# Altium PCB 0060631C.PcbDoc (part 2 of 7)
Units mil, origin at the board's own origin, x right, y up, seen from the top; angles counter-clockwise.
Board outline 5480 x 8249 mil, 6 copper layers (Top Layer, Mid-Layer 1, Mid-Layer 2, Internal Plane 1, Internal Plane 2, Bottom Layer); 514 components, 269 nets, 1375 pads, 1334 vias.
Unrouted connection lines stored in the file: 126.
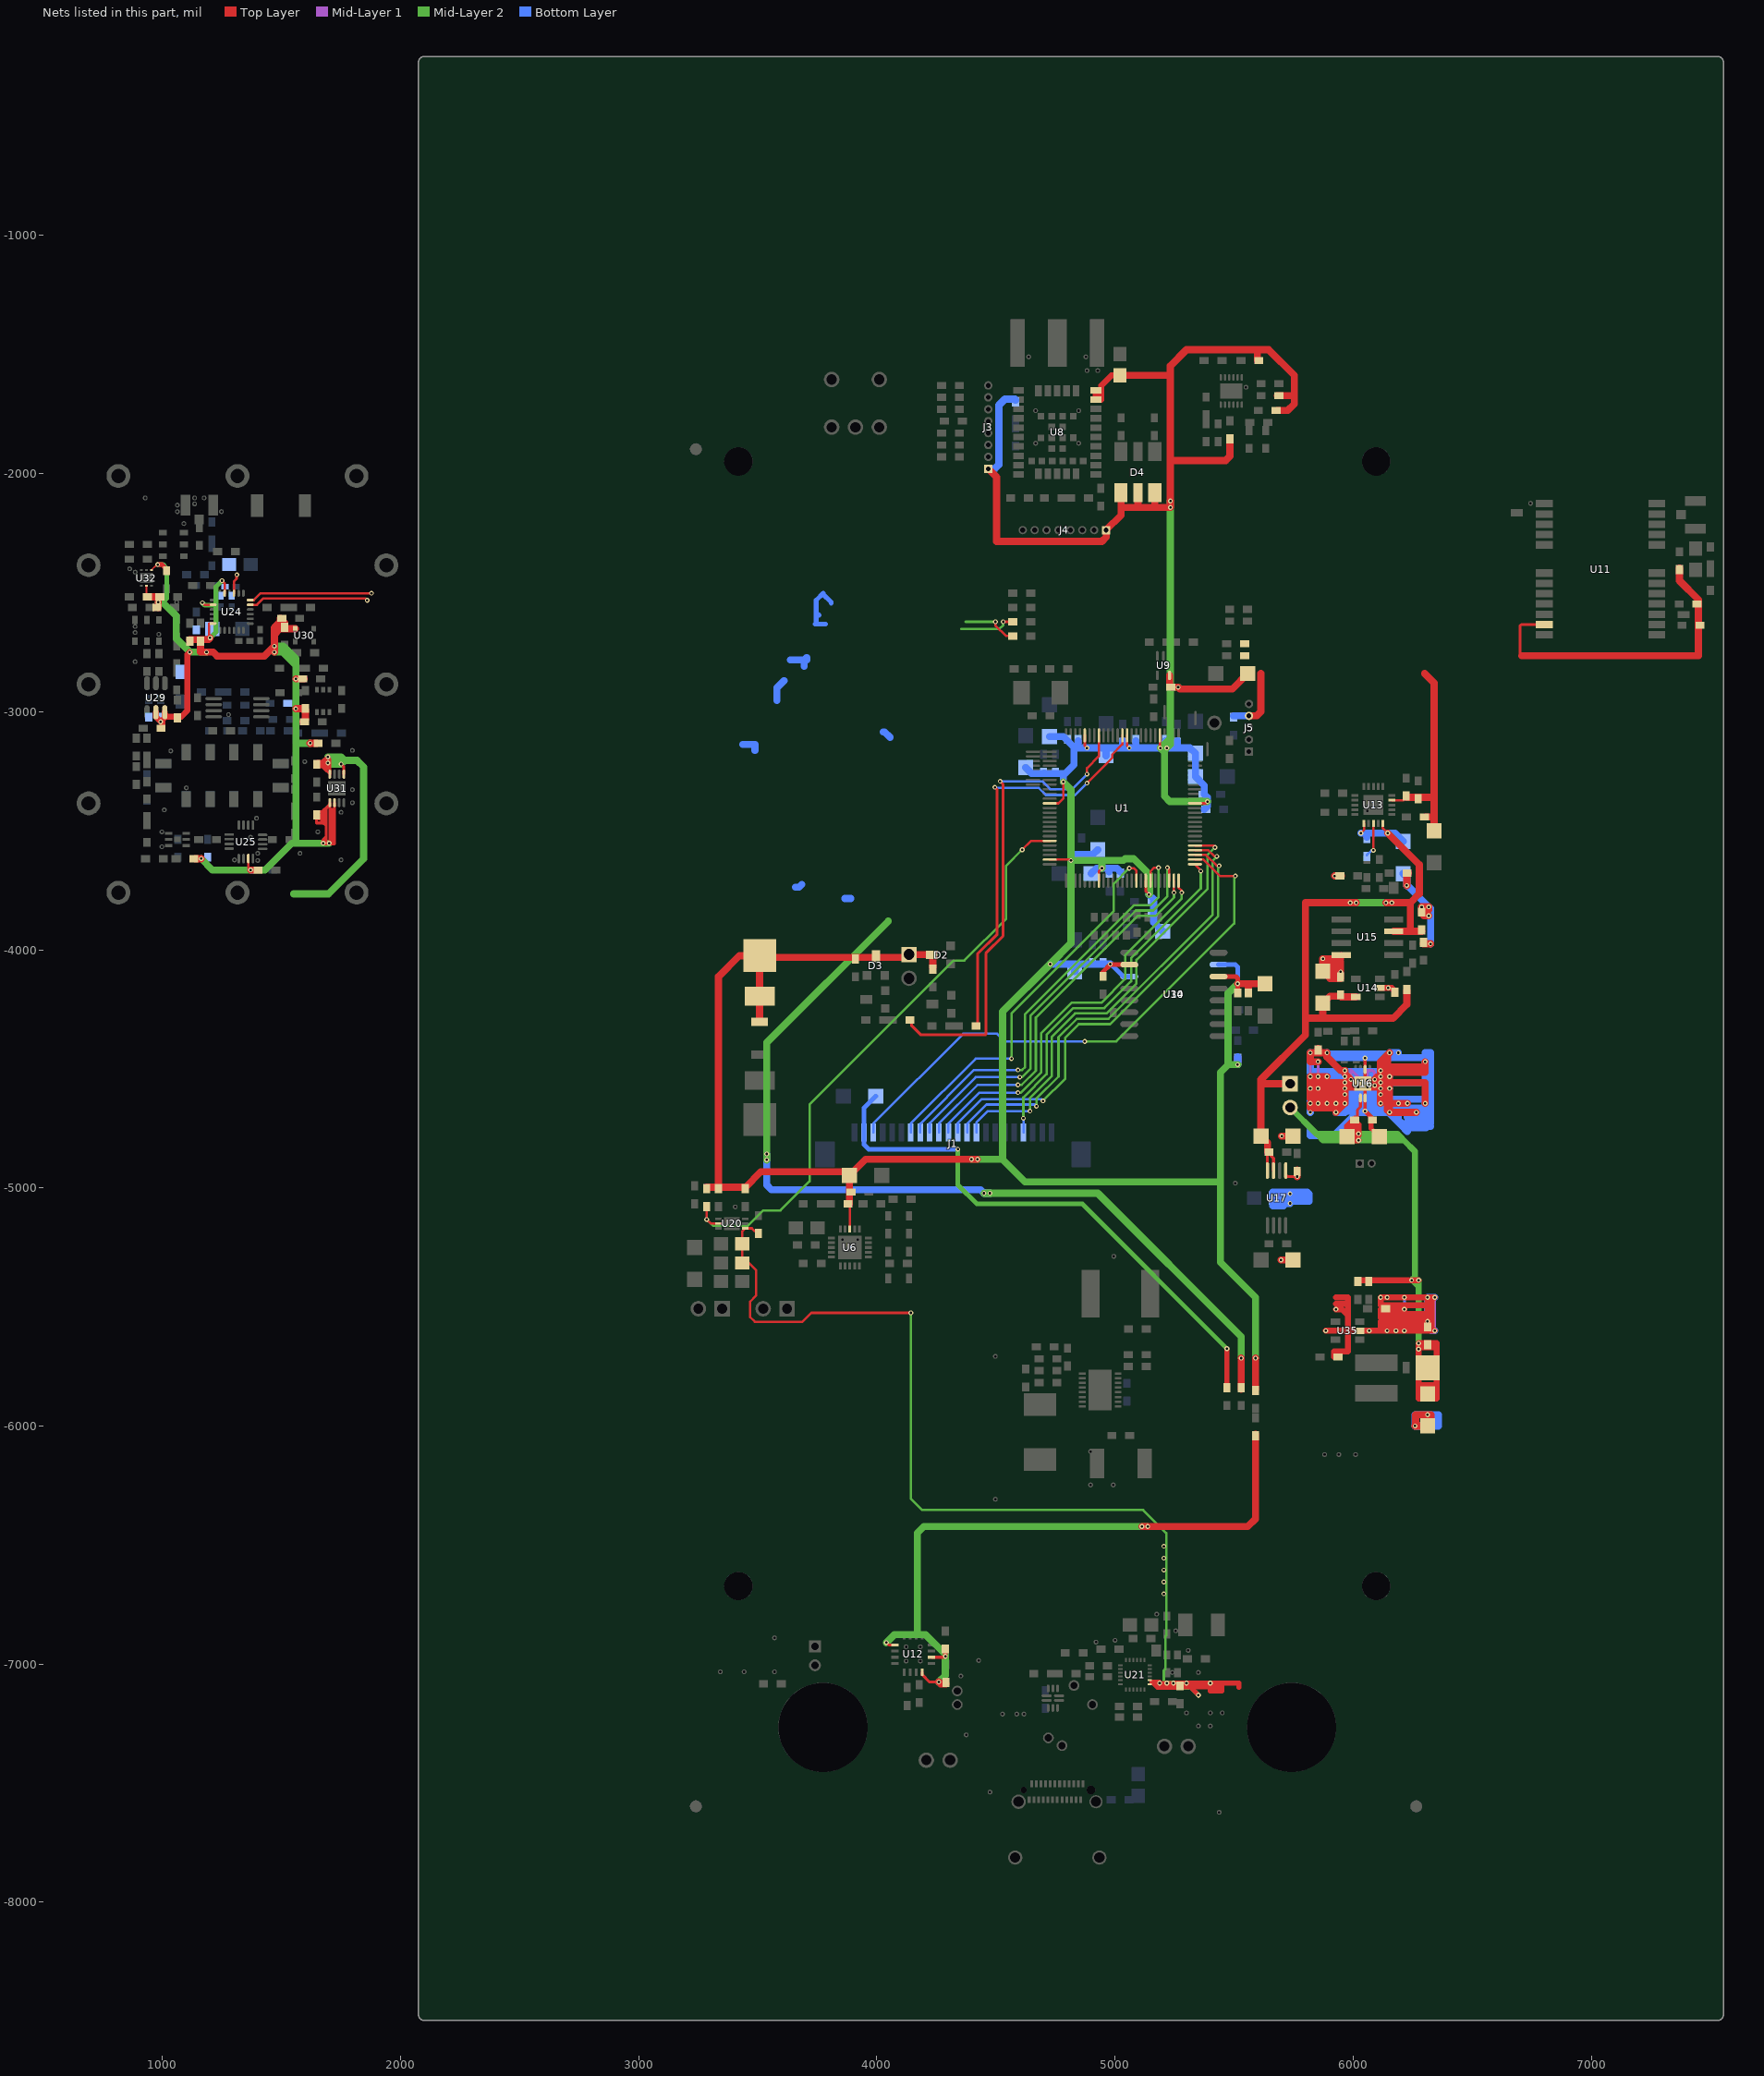
[diagram p6: the nets of this part, all layers, seen from the top]

## Via types
v1: diameter 20, hole 10, Top Layer to Bottom Layer, 1334 vias

## Nets (pads, with @x,y where several pads share a name; then routed paths per layer and width w, separated by ;. In a path a pad name is that pad's centre, name@x,y a point inside that pad or via, vN(x,y) a via of type N, cw(c..) or ccw(c..) an arc to the next point about the centre after c; other vN are vias at no path point)
+3.3V: BZ1.1 BZ2.1 BZ3.1 BZ4.1 C1.1 C2.1 C3.1 C4.1 C5.1 C6.1 C7.1 C8.1 C9.1 C10.1 C13.1 C14.1 C15.1 C16.1 C17.1 C18.1 C19.1 C20.1 C21.1 C22.1 C23.1 C24.1 C25.1 C26.1 C27.1 C30.1 C32.1 C33.1 C34.1 C35.1 C36.1 C37.1 C38.1 C41.1 C47.1 C57.1 C122.1 C123.1 C124.1 D2.3 D3.3 D4.2 D4.4 D4.6 J3.1 J4.1 J5.4 R3.1 R8.1 R22.1 R25.1 R30.1 R31.1 R32.2 R40.2 R42.2 R43.1 R44.2 R67.1 R74.2 R75.1 R80.2 R81.1 R83.1 R84.1 R85.1 R124.2 U1.14 U1.30 U1.37 U1.46 U1.62 U1.74 U1.83 U1.93 U6.18 U8.9 U8.10 U9.5 U10.2 U10.14 U11.23 U13.14 U34.2 U34.14 | length 21028.3
  Top Layer w10: R25.1@3885,-5067.5 3886.4,-5068.9 U6.18@3886.4,-5173 ; U1.74@4725.6,-3621.3 4811.3,-3621.3 v1(4815,-3625) ; U1.62@4725.6,-3384.9 4762.6,-3384.9 4782.5,-3365 v1(4782.5,-3295) ; U1.46@4873,-3099.6 4873,-3143 v1(4882.5,-3152.5) ; U1.83@4932.1,-3709.6 4932.1,-3670.4 v1(4945,-3657.5) ; U1.37@5050.3,-3099.6 5050.3,-3142.8 v1(5060,-3152.5) ; U1.93@5129.1,-3709.6 5129.1,-3754.1 v1(5142.5,-3767.5) ; U1.30@5188.2,-3099.6 v1@5188.2,-3150.7 ; U1.14@5335.6,-3384.9 5380.1,-3384.9 v1(5387.5,-3377.5) ; U13.14@6162.3,-3372.2 6210.3,-3372.2 C41.1@6222.5,-3360 ; v1@5188.2,-3150.7 v1(5190,-3152.5) v1@5188.2,-3150.7
  Top Layer w12: 6707.5,-2765 6700,-2757.5 6700,-2690 6700,-2640 6705.8,-2634.2 U11.23@6802.8,-2634.2
  Top Layer w20: R40.2@4950,-4117.5 4950,-4092.5 v1@4980,-4062.5 ; v1(4980,-4060) v1@4980,-4062.5 ; U10.2@5060,-4062.5 v1@4980,-4062.5 ; U10.14@5435,-4112.5 5507.5,-4112.5 5515,-4120 v1(5515,-4142.5) ; v1(5515,-4142.5) 5515,-4175 v1(5515,-4142.5)
  Top Layer w26: C25.1@5020,-1587.5 4985,-1587.5 4942.3,-1630.2 4942.3,-1649.8 ; 4942.3,-1649.8 4942.3,-1689.2 U8.9@4919.5,-1689.2 U8.10@4919.5,-1649.8 4942.3,-1649.8
  Top Layer w30: R83.1@3285,-4997.5 R84.1@3335,-4997.5 ; BZ2.1@3507.5,-4302.5 BZ1.1@3507.5,-4195 BZ4.1@3507.5,-4025 ; R25.1@3885,-5067.5 3885,-5017.5 C32.1@3885,-4947.5 ; R8.1@4235,-4075 4235,-4020 BZ3.1@4135,-4020 4122.5,-4032.5 3997.5,-4032.5 3910,-4032.5 3515,-4032.5 BZ4.1@3507.5,-4025 ; v1(4422.5,-4880) v1(4397.5,-4880) 3952.5,-4880 C32.1@3885,-4947.5 ; J3.1@4467.5,-1980 4502.5,-2015 4502.5,-2285 4945,-2285 4963.8,-2266.2 J4.1@4963.8,-2236.2 ; J4.1@4962.5,-2237.5 J4.1@4963.8,-2236.2 ; C25.1@5020,-1587.5 5232.5,-1587.5 ; D4.2@5025,-2080.5 5025,-2142.5 ; D4.4@5096,-2080.5 5096,-2141.5 ; U9.5@5228.7,-2847.5 5228.7,-2886.2 5240,-2897.5 v1(5265,-2897.5) 5272.5,-2905 5492.5,-2905 C37.1@5557.5,-2840 ; R81.1@5482.5,-1860 5482.5,-1927.5 5465,-1945 5232.5,-1945 ; v1(5515,-4142.5) 5560,-4142.5 ; C34.1@5560,-4175 5560,-4142.5 ; J5.4@5562.5,-3017.5 5595,-3017.5 5612.5,-3000 5612.5,-2840 ; R67.1@5590,-5845 v1(5590,-5715) ; R74.2@5597.5,-1525 5597.5,-1480 ; C35.1@5630,-4142.5 5560,-4142.5 ; R75.1@5682.5,-1735 5725,-1735 5752.5,-1707.5 5752.5,-1672.5 ; R80.2@5682.5,-1672.5 5752.5,-1672.5 ; C41.1@6222.5,-3360 6272.5,-3360 6340,-3360 ; 6300,-2840 6340,-2880 6340,-3360 ; R31.1@6305,-3442.5 6340,-3442.5 ; C57.1@6340,-3500 6340,-3442.5 ; 6707.5,-2765 6762.5,-2765 7450,-2765 7450,-2637.5 7450,-2547.5 7450,-2530 7370,-2450 R42.2@7370,-2397.5 ; R84.1@3335,-4997.5 3447.5,-4997.5 3512.5,-4932.5 3870,-4932.5 C32.1@3885,-4947.5 ; R84.1@3335,-4997.5 3335,-4112.5 3422.5,-4025 BZ4.1@3507.5,-4025 ; J4.1@4963.8,-2236.2 5025,-2175 5025,-2142.5 ; 5025,-2142.5 5095,-2142.5 ; 5095,-2142.5 5096,-2141.5 ; 5095,-2142.5 5096,-2142.5 ; 5096,-2142.5 5167,-2142.5 D4.6@5167,-2080.5 5167,-2142 5167.5,-2142.5 ; 5096,-2142.5 5167.5,-2142.5 ; 5096,-2142.5 5096,-2141.5 ; 5167.5,-2142.5 v1(5232.5,-2142.5) v1(5232.5,-2115) 5232.5,-1945 ; 5232.5,-1945 5232.5,-1587.5 ; 5232.5,-1587.5 5232.5,-1547.5 5300,-1480 5597.5,-1480 ; 5597.5,-1480 5645,-1480 5752.5,-1587.5 5752.5,-1672.5 ; 6340,-3442.5 6340,-3360
  Mid-Layer 2 w30: v1(4397.5,-4880) v1(4422.5,-4880) 4527.5,-4880 ; v1(4782.5,-3295) 4815,-3327.5 v1(4815,-3625) ; v1(4945,-3657.5) 4945,-3625 ; v1(5142.5,-3767.5) 5145,-3765 5145,-3685 5077.5,-3617.5 5042.5,-3617.5 5035,-3625 4945,-3625 ; v1(5232.5,-2115) v1(5232.5,-2142.5) 5232.5,-2897.5 ; v1(5265,-2897.5) 5232.5,-2897.5 ; v1(5387.5,-3377.5) 5230,-3377.5 5207.5,-3355 5207.5,-3170 ; v1(5515,-4482.5) 5475,-4482.5 ; v1(5515,-4142.5) 5475,-4182.5 5475,-4482.5 ; v1(5590,-5715) 5590,-5460 5442.5,-5312.5 5442.5,-4975 ; 4527.5,-4880 4622.5,-4975 5442.5,-4975 ; 4527.5,-4880 4527.5,-4260 v1(4727.5,-4060) 4815,-3972.5 v1(4815,-3625) ; v1(4815,-3625) 4945,-3625 ; v1(5190,-3152.5) v1(5217.5,-3152.5) ; v1(5190,-3152.5) 5207.5,-3170 ; v1(5190,-3152.5) 5207.5,-3170 ; v1(5190,-3152.5) 5232.5,-3110 ; 5207.5,-3170 5207.5,-3162.5 v1(5217.5,-3152.5) ; v1(5217.5,-3152.5) 5232.5,-3137.5 5232.5,-3110 ; 5232.5,-3110 5232.5,-2897.5 ; 5442.5,-4975 5442.5,-4515 5475,-4482.5
  Bottom Layer w20: v1(4980,-4060) 4982.5,-4060 5035,-4112.5 U34.14@5060,-4112.5 ; U34.2@5435,-4062.5 5505,-4062.5 5515,-4072.5 v1(5515,-4142.5)
  Bottom Layer w30: J3.1@4467.5,-1980 4495,-1980 4512.5,-1962.5 4512.5,-1712.5 4537.5,-1687.5 4580,-1687.5 4582.5,-1690 R30.1@4582.5,-1692.5 ; C20.1@4625,-3235 4650,-3260 C26.1@4700,-3260 ; C18.1@4725,-3105 4782.5,-3105 4800,-3122.5 4827.5,-3150 4827.5,-3152.5 ; v1(4727.5,-4060) 4832.5,-4060 ; v1(4782.5,-3295) 4782.5,-3260 ; C124.1@4830,-4092.5 4832.5,-4090 4832.5,-4060 ; C27.1@4845,-3122.5 4845,-3152.5 ; C19.1@4900,-3680 4922.5,-3657.5 v1(4945,-3657.5) 4975,-3657.5 ; C24.1@4927.5,-3580 4907.5,-3600 4860,-3600 C1.1@4815,-3600 ; C22.1@4962.5,-3185 4962.5,-3152.5 ; C5.1@4975,-3672.5 4975,-3657.5 ; v1(4980,-4060) 4950,-4060 4905,-4060 4832.5,-4060 ; C6.1@5022.5,-3672.5 5007.5,-3657.5 4975,-3657.5 ; C13.1@5032.5,-3122.5 5032.5,-3152.5 ; C14.1@5087.5,-3122.5 5087.5,-3152.5 ; v1(5142.5,-3767.5) 5162.5,-3787.5 5162.5,-3797.5 5162.5,-3847.5 5162.5,-3885 C23.1@5200,-3922.5 ; C9.1@5212.5,-3122.5 v1@5212.5,-3152.5 ; C8.1@5262.5,-3122.5 5262.5,-3152.5 ; C16.1@5375,-3410 5387.5,-3397.5 v1(5387.5,-3377.5) 5387.5,-3360 5375,-3347.5 5375,-3310 C21.1@5337.5,-3272.5 C17.1@5337.5,-3175 5315,-3152.5 5262.5,-3152.5 ; R32.2@5497.5,-3017.5 J5.4@5562.5,-3017.5 ; v1(5515,-4482.5) R124.2@5515,-4450 ; C26.1@4700,-3260 C26.1@4702.5,-3260 ; C26.1@4700,-3260 4702.5,-3257.5 C26.1@4702.5,-3260 ; C26.1@4702.5,-3260 4750,-3260 4782.5,-3260 ; 4782.5,-3260 4790,-3260 4827.5,-3222.5 4827.5,-3152.5 ; C1.1@4815,-3600 v1(4815,-3625) C1.1@4815,-3600 ; 4827.5,-3152.5 4845,-3152.5 ; 4845,-3152.5 v1(4882.5,-3152.5) ; 4845,-3152.5 v1(4882.5,-3152.5) ; v1(4882.5,-3152.5) 4962.5,-3152.5 ; 4962.5,-3152.5 5032.5,-3152.5 ; 5032.5,-3152.5 v1(5060,-3152.5) ; v1(5060,-3152.5) 5087.5,-3152.5 ; v1(5060,-3152.5) 5087.5,-3152.5 ; 5087.5,-3152.5 v1(5190,-3152.5) ; v1(5190,-3152.5) v1@5212.5,-3152.5 ; v1(5190,-3152.5) v1@5212.5,-3152.5 ; v1@5212.5,-3152.5 v1(5217.5,-3152.5) 5262.5,-3152.5
+3.3V_LCD: C31.1 J1.21 R71.2 | length 2360.9
  Top Layer w20: R71.2@5470,-5845 v1(5470,-5675)
  Mid-Layer 2 w20: v1(4340,-4837.5) 4340,-4987.5 4420,-5067.5 4862.5,-5067.5 v1(5470,-5675)
  Bottom Layer w20: C31.1@3995,-4615 3945.5,-4664.5 J1.21@3945.5,-4767 3945.5,-4818 3965,-4837.5 v1(4340,-4837.5)
+3.3V_RF: C104.1 R72.2 U31.5 U31.8 ~FV2.FV | length 5483
  Top Layer w12: C104.1@1647.5,-3215 C104.1@1650,-3217.5 ; v1(1695,-3215) 1702.8,-3222.8 ; v1(1695,-3190) 1702.8,-3197.8 1702.8,-3222.8 ; U31.5@1761.8,-3262.7 1761.8,-3231.8 ; C104.1@1650,-3217.5 1650,-3232.5 1672.6,-3232.5 1680.1,-3240 ; C104.1@1650,-3217.5 1660,-3227.5 1672.5,-3227.5 ; 1672.5,-3227.5 1682.5,-3237.5 ; 1672.5,-3227.5 1702.8,-3227.5 ; 1680.1,-3240 U31.8@1702.8,-3262.7 1702.8,-3237.5 ; 1680.1,-3240 1682.6,-3237.5 1682.5,-3237.5 ; 1682.5,-3237.5 1702.8,-3237.5 ; 1702.8,-3237.5 1702.8,-3227.5 ; 1702.8,-3227.5 1702.8,-3222.8 ; 1761.8,-3231.8 v1(1750,-3220) 1761.8,-3231.8
  Top Layer w20: C104.1@1647.5,-3215 C104.1@1650,-3212.5 ; C104.1@1650,-3212.5 C104.1@1652.5,-3215 ; C104.1@1650,-3212.5 1672.5,-3212.5 ; C104.1@1652.5,-3215 v1(1695,-3215) C104.1@1652.5,-3215 ; 1672.5,-3212.5 v1(1695,-3190) 1672.5,-3212.5
  Top Layer w30: R72.2@5530,-5845 v1(5530,-5715)
  Mid-Layer 2 w30: 1550.5,-3765 1697.5,-3765 1845,-3617.5 1845,-3232.5 1817.5,-3205 1765,-3205 ; v1(3537.5,-4882.5) v1(3537.5,-4857.5) 3537.5,-4390 4047.5,-3880 ; v1(4450,-5022.5) v1(4475,-5022.5) 4927.5,-5022.5 5530,-5625 v1(5530,-5715) ; ~FV2.FV@1695,-3220 v1(1750,-3220) ; ~FV2.FV@1695,-3220 v1(1750,-3220) ; ~FV2.FV@1695,-3220 v1(1695,-3215) v1(1695,-3190) 1750,-3190 ; v1(1750,-3220) 1765,-3205 ; v1(1750,-3220) 1750,-3190 ; v1(1750,-3220) 1750,-3190 ; 1750,-3190 1765,-3205
  Bottom Layer w30: v1(3537.5,-4857.5) v1(3537.5,-4882.5) 3537.5,-4987.5 3557.5,-5007.5 4435,-5007.5 v1(4450,-5022.5) v1(4475,-5022.5)
+3.3V_USB: C40.1 R73.2 R91.1 U12.1 U12.8 U12.10 | length 2959.8
  Top Layer w12: v1(4040,-6910) 4050.1,-6920.1 U12.1@4075.7,-6920.1 ; U12.8@4190.6,-7035 4190.6,-7045.6 4220,-7075 v1(4260,-7075) ; U12.10@4228.7,-6971.3 4283.7,-6971.3 v1(4287.5,-6967.5)
  Top Layer w20: v1(4287.5,-6967.5) 4287.5,-6942.5 v1(4287.5,-6967.5)
  Top Layer w30: R91.1@4290,-7082.5 4267.5,-7082.5 ; v1(5112.5,-6422.5) v1(5137.5,-6422.5) 5557.5,-6422.5 5590,-6390 R73.2@5590,-6035 ; 4267.5,-7082.5 v1(4260,-7075) 4267.5,-7082.5
  Mid-Layer 2 w30: v1(4040,-6910) 4073.7,-6876.3 4170,-6876.3 ; v1(4260,-7075) 4287.5,-7047.5 v1(4287.5,-6967.5) 4287.5,-6960 4203.8,-6876.3 4170,-6876.3 ; v1(5137.5,-6422.5) v1(5112.5,-6422.5) 4197.5,-6422.5 4170,-6450 4170,-6876.3
+3.3VA: C42.1 C43.1 C51.1 C52.1 C54.1 C56.1 JP2.1 R52.1 R61.1 U13.6 U13.10 U14.5 U15.7 U17.7 U17.8 | length 3657
  Top Layer w10: v1(6032.5,-3510) 6045.5,-3497 U13.6@6045.5,-3469.3 ; U13.10@6124.3,-3469.3 6124.3,-3489.3 ; 6124.3,-3489.3 v1(6145,-3510) 6124.3,-3489.3
  Top Layer w12: U17.8@5640,-4927.5 5640,-4850 5665.6,-4875.6 U17.7@5665.6,-4927.5
  Top Layer w30: R61.1@5640,-4850 5640,-4810 C56.1@5612.5,-4782.5 5612.5,-4562.5 ; JP2.1@5735,-4562.5 5612.5,-4562.5 ; U14.5@6010.5,-4197.5 5950,-4197.5 5947.5,-4195 5902.5,-4195 C43.1@5872.5,-4225 5872.5,-4287.5 ; v1(6012.5,-3802.5) v1(5987.5,-3802.5) 5800,-3802.5 5800,-4287.5 ; v1(6137.5,-3802.5) v1(6162.5,-3802.5) 6240,-3802.5 ; v1(6145,-3510) 6277.5,-3642.5 6277.5,-3765 6240,-3802.5 ; U15.7@6170,-3922.5 6240,-3922.5 ; R52.1@6225,-4172.5 6225,-4230 6167.5,-4287.5 5872.5,-4287.5 ; C52.1@6287.5,-3922.5 6240,-3922.5 ; 5612.5,-4562.5 5612.5,-4545 5800,-4357.5 5800,-4287.5 ; 5800,-4287.5 5872.5,-4287.5 ; 6240,-3922.5 6240,-3802.5
  Mid-Layer 2 w30: v1(5987.5,-3802.5) v1(6012.5,-3802.5) v1(6137.5,-3802.5) v1(6162.5,-3802.5)
  Bottom Layer w30: v1(6032.5,-3510) 6057.5,-3510 ; C54.1@6057.5,-3527.5 6057.5,-3510 ; C42.1@6210,-3545 6175,-3510 v1(6145,-3510) ; 6057.5,-3510 v1(6145,-3510) ; 6057.5,-3510 v1(6145,-3510)
+3V: C76.1 C81.2 C88.1 C90.1 C92.1 C96.1 C97.2 C101.2 C102.2 C105.1 C108.2 C110.1 C111.2 C112.2 C113.2 C120.1 C129.1 L5.1 L9.2 L16.1 L18.1 R101.1 R105.2 R106.1 R108.1 R111.2 R114.1 R115.1 R117.1 U24.2 U24.6 U24.21 U24.23 U25.15 U29.5 U29.6 U30.4 U31.1 U31.2 U32.1 U32.5 ~FV4.FV | length 6537.2
  Top Layer w7: U32.5@932.5,-2472 932.5,-2507.5 L18.1@942.5,-2517.5 ; U32.1@954.1,-2405 976.6,-2382.5 v1(980,-2382.5)
  Top Layer w10: v1(1167.5,-2542.5) 1176,-2551 U24.2@1212.5,-2551 ; 1192.5,-2697.5 ~FV4.FV@1195.2,-2685.2 ; v1(1200,-2690) ~FV4.FV@1195.2,-2685.2 ; U24.6@1212.5,-2629.8 1195.2,-2629.8 ~FV4.FV@1195.2,-2685.2 ; v1(1250,-2450) 1261.1,-2461.1 U24.23@1261.1,-2502.5 ; U24.21@1300.5,-2502.5 1300.5,-2452.5 1311.2,-2441.8 1311.2,-2426.3 v1(1312.5,-2425) ; U25.15@1360.1,-3616.9 1360.1,-3655.1 v1(1370,-3665)
  Top Layer w12: v1(1675,-3552.5) 1675,-3537.5 1686.3,-3526.2 ; 1685,-3552.5 1686.3,-3551.2 1686.3,-3526.2 ; 1687.5,-3552.5 1687.5,-3525 ; 1692.5,-3402.8 1687.5,-3402.8 ; v1(1700,-3552.5) 1702.8,-3549.7 1702.8,-3410 ; U31.1@1702.8,-3382.5 U31.1@1702.8,-3387.5 ; U31.2@1722.5,-3382.5 1722.5,-3410 ; C105.1@1647.5,-3440 1647.5,-3467.5 1667.5,-3467.5 ; C105.1@1647.5,-3440 1657.5,-3450 1657.5,-3435.1 C105.1@1649.2,-3426.8 ; C105.1@1647.5,-3440 C105.1@1649.2,-3426.8 ; C105.1@1649.2,-3426.8 1650,-3420 1670.3,-3420 ; 1667.5,-3467.5 1675,-3467.5 ; 1667.5,-3467.5 1667.5,-3422.8 1670.3,-3420 ; 1670.3,-3420 1678.9,-3411.4 ; 1675,-3467.5 1687.5,-3480 ; 1675,-3467.5 1678.9,-3463.6 1678.9,-3411.4 ; 1678.9,-3411.4 1687.5,-3402.8 ; 1686.3,-3526.2 1687.5,-3525 ; 1687.5,-3525 1687.5,-3480 ; 1687.5,-3480 1687.5,-3402.8 ; 1687.5,-3402.8 U31.1@1702.8,-3387.5 ; 1702.8,-3410 1712.5,-3410 ; 1702.8,-3410 U31.1@1702.8,-3387.5 ; 1712.5,-3410 1712.5,-3540 1722.5,-3530 ; 1712.5,-3410 1722.5,-3410 ; 1722.5,-3547.5 1722.5,-3555 1707.5,-3555 1715,-3547.5 1722.5,-3547.5 ; 1722.5,-3547.5 1722.5,-3530 ; 1722.5,-3530 1722.5,-3410
  Top Layer w20: R115.1@1017.5,-2402.5 997.5,-2382.5 ; v1(1675,-3552.5) 1685,-3552.5 1687.5,-3552.5 ; 997.5,-2382.5 v1(980,-2382.5) 997.5,-2382.5
  Top Layer w25: U29.5@972.5,-3002.5 U29.5@972.5,-3022.5 ; L5.1@1000,-3070 1000,-3050 ; U29.6@1010,-3002.5 U29.6@1010,-3010 ; C81.2@1062.5,-3020 C81.2@1063.7,-3021.2 ; v1(1115,-2750) 1105,-2760 1105,-2995 1078.8,-3021.2 C81.2@1063.7,-3021.2 ; U29.5@972.5,-3022.5 v1(992.5,-3042.5) ; U29.5@972.5,-3022.5 v1(992.5,-3042.5) ; v1(992.5,-3042.5) 1000,-3050 ; v1(992.5,-3042.5) 1000,-3035 ; 1000,-3050 1000,-3035 ; 1000,-3035 1010,-3025 U29.6@1010,-3010 ; U29.6@1010,-3010 1021.2,-3021.2 C81.2@1063.7,-3021.2
  Top Layer w30: L18.1@942.5,-2517.5 982.5,-2517.5 v1(982.5,-2540) C108.2@982.5,-2562.5 ; L9.2@1115,-2697.5 R111.2@1160,-2697.5 ; R106.1@1137.5,-3617.5 v1(1162.5,-3617.5) ; v1(1370,-3665) C120.1@1395,-3665 ; v1(1470,-2750) v1(1470,-2725) ; C88.1@1495,-2607.5 C88.1@1495,-2610 ; U30.4@1557.5,-2652 R101.1@1524.5,-2652 ; v1(1560,-2987.5) 1595,-2987.5 1600,-2992.5 1600,-3032.5 C110.1@1590,-3042.5 ; v1(1560,-2862.5) R105.2@1595,-2862.5 ; v1(1620,-3132.5) R114.1@1647.5,-3132.5 ; R111.2@1160,-2697.5 1160,-2750 v1(1185,-2750) 1212.5,-2750 1230,-2767.5 1427.5,-2767.5 v1(1470,-2725) ; R111.2@1160,-2697.5 1192.5,-2697.5 ; 1192.5,-2697.5 v1(1200,-2690) 1192.5,-2697.5 ; v1(1470,-2725) 1470,-2675 ; 1470,-2675 1493,-2652 ; 1470,-2675 1470,-2647.5 ; 1470,-2647.5 1474.5,-2652 1493,-2652 ; 1470,-2647.5 1495,-2622.5 C88.1@1495,-2610 ; 1493,-2652 R101.1@1524.5,-2652 ; C88.1@1495,-2610 1512.5,-2627.5 1512.5,-2640 R101.1@1524.5,-2652
  Mid-Layer 2 w20: v1(980,-2382.5) 1002.5,-2382.5 1017.5,-2397.5 1017.5,-2402.5 1017.5,-2525 1002.5,-2540 ; v1(1167.5,-2542.5) 1177.5,-2552.5 1225,-2552.5 ; v1(1200,-2690) 1225,-2665 1225,-2552.5 ; v1(1250,-2450) 1225,-2475 1225,-2552.5
  Mid-Layer 2 w30: v1(982.5,-2540) 1000,-2540 ; 1002.5,-2540 1000,-2540 ; v1(1162.5,-3617.5) 1210,-3665 v1(1370,-3665) 1395,-3665 1430,-3665 1542.5,-3552.5 1560,-3552.5 ; v1(1185,-2750) v1(1115,-2750) 1057.5,-2692.5 1057.5,-2597.5 1000,-2540 ; v1(1470,-2750) 1505,-2750 1560,-2805 ; v1(1470,-2725) 1507.5,-2725 1560,-2777.5 1560,-2805 ; v1(1620,-3132.5) 1560,-3132.5 ; v1(1700,-3552.5) v1(1675,-3552.5) ; 1560,-3552.5 1560,-3132.5 ; 1560,-3552.5 v1(1675,-3552.5) ; 1560,-3552.5 v1(1675,-3552.5) ; 1560,-3132.5 v1(1560,-2987.5) v1(1560,-2862.5) 1560,-2805
  Bottom Layer w20: 3757.5,-2595 3745,-2582.5 ; 3785,-2632.8 3740,-2632.8 3745,-2627.8 3745,-2582.5 ; 3807.5,-2545 3807.5,-2540 3775,-2507.5 3775,-2502.5 3745,-2532.5 3745,-2570 3745,-2582.5
  Bottom Layer w30: 3437.5,-3137.5 3487.5,-3137.5 3487.5,-3162.5 ; 3580,-2952.5 3580,-2900 ; 3637.5,-2782.5 3695,-2782.5 ; 3657.5,-3737.5 3672.5,-3737.5 3685,-3725 ; 3695,-2810 3695,-2785 3697,-2782.5 ; 3865,-3785 3890,-3785 ; 4027.5,-3085 4032.5,-3085 4055,-3107.5 ; 3580,-2900 3610,-2870 3580,-2900 ; 3695,-2782.5 3697,-2782.5 ; 3695,-2782.5 3705,-2772.5 ; 3697,-2782.5 3705,-2782.5 3705,-2772.5 ; 3697,-2782.5 3705,-2772.5
+5VA: C46.1 C53.1 C127.1 C128.1 C132.1 D8.1 JP2.2 R128.1 U16.6 | length 3916.8
  Top Layer w12: C53.1@6006.3,-4708.7 6017.5,-4697.5 6017.5,-4672.5 6030.4,-4659.6 U16.6@6030.4,-4622.3
  Top Layer w25: C53.1@6006.3,-4708.7 C53.1@6001.3,-4713.7 ; C127.1@6020,-5387.5 6065,-5387.5 v1(6245,-5387.5) v1(6275,-5387.5) ; v1(6022.5,-4800) 5990,-4800 C46.1@5981.3,-4791.3 ; C132.1@6312.5,-5865 C132.1@6312.5,-5885 ; C128.1@6312.5,-5665 C128.1@6312.5,-5652.5 ; C46.1@5975,-4785 C46.1@5981.3,-4791.3 ; C46.1@5975,-4785 5975,-4740 C53.1@5991.2,-4723.8 ; C46.1@5975,-4785 C46.1@5987.5,-4772.5 ; C46.1@5981.3,-4791.3 5992.6,-4780 6022.5,-4780 v1(6022.5,-4772.5) ; C46.1@5987.5,-4772.5 C46.1@5991.2,-4768.8 ; C46.1@5987.5,-4772.5 C46.1@6002.5,-4772.5 ; C46.1@5991.2,-4768.8 5998.8,-4768.8 C46.1@6002.5,-4772.5 ; C46.1@5991.2,-4768.8 C53.1@5991.2,-4723.8 ; C53.1@5991.2,-4723.8 6000,-4715 C53.1@6001.3,-4713.7 ; C53.1@6001.3,-4713.7 C53.1@6008.8,-4721.2 ; C46.1@6002.5,-4772.5 6007.5,-4767.5 6007.5,-4722.5 C53.1@6008.8,-4721.2 ; C46.1@6002.5,-4772.5 v1(6022.5,-4772.5) ; C53.1@6008.8,-4721.2 6022.5,-4734.9 v1(6022.5,-4772.5) ; 6275,-5827.5 6350,-5827.5 ; 6275,-5827.5 6275,-5885 C132.1@6312.5,-5885 ; 6275,-5827.5 D8.1@6275,-5755 ; D8.1@6275,-5755 v1(6275,-5677.5) v1@6275,-5670 ; D8.1@6275,-5755 D8.1@6312.5,-5755 D8.1@6350,-5755 ; v1@6275,-5670 v1(6275,-5652.5) C128.1@6312.5,-5652.5 ; v1@6275,-5670 6350,-5670 ; C132.1@6312.5,-5885 6350,-5885 6350,-5827.5 ; C128.1@6312.5,-5652.5 6350,-5652.5 6350,-5670 ; 6350,-5827.5 D8.1@6350,-5755 ; D8.1@6350,-5755 6350,-5670
  Mid-Layer 2 w25: JP2.2@5735,-4662.5 5845,-4772.5 ; v1(6245,-5387.5) 6260,-5372.5 6260,-4847.5 6212.5,-4800 ; v1(6275,-5677.5) v1(6275,-5652.5) 6275,-5415 ; 5845,-4772.5 5857.5,-4785 ; 5845,-4772.5 v1(6022.5,-4772.5) 6185,-4772.5 6200,-4787.5 ; 5857.5,-4785 5872.5,-4800 v1(6022.5,-4800) ; 5857.5,-4785 6022.5,-4785 ; v1(6022.5,-4800) 6022.5,-4785 ; v1(6022.5,-4800) 6092.5,-4800 ; 6022.5,-4785 6077.5,-4785 6080,-4787.5 ; 6080,-4787.5 6200,-4787.5 ; 6080,-4787.5 6092.5,-4800 ; 6092.5,-4800 6212.5,-4800 ; 6200,-4787.5 6212.5,-4800 ; 6275,-5415 6247.5,-5387.5 v1(6275,-5387.5) 6275,-5415
AL/CC_1: R83.2 U1.70 U20.5 | length 2558.7
  Top Layer w10: R83.2@3285,-5072.5 v1(3285,-5132.5) 3302.8,-5150.3 U20.5@3335.1,-5150.3 ; v1(4610,-3580) 4647.5,-3542.5 U1.70@4725.6,-3542.5
  Mid-Layer 2 w10: v1(3285,-5132.5) 3312.5,-5160 3457.5,-5160 3522.5,-5095 3595,-5095 3717.5,-4972.5 3717.5,-4650 4322.5,-4045 4367.5,-4045 4542.5,-3870 4542.5,-3647.5 v1(4610,-3580)
BAT_2: C64.1 C71.1 R93.1 R94.1 U20.1 U21.13 U21.14 ~FV5.FV | length 5706
  Top Layer w7: U21.13@5146.5,-7084 U21.13@5147.5,-7084 ; U21.14@5146.5,-7068.2 U21.14@5147.5,-7068.2 ; 5170,-7090.2 5267.5,-7090.2 5267.6,-7090.2 C71.1@5268.8,-7091.4 ; v1(5245,-7080.2) v1(5217.5,-7080.2) v1(5187.5,-7080.2) ; U21.13@5147.5,-7084 U21.13@5147.5,-7080.2 ; U21.13@5147.5,-7084 U21.13@5151.2,-7084 ; U21.13@5147.5,-7080.2 U21.13@5155,-7080.2 ; U21.13@5147.5,-7080.2 U21.14@5147.5,-7068.2 ; U21.14@5147.5,-7068.2 5188,-7068.2 v1@5195,-7075.2 ; U21.14@5147.5,-7068.2 5154.5,-7075.2 v1@5195,-7075.2 ; U21.13@5151.2,-7084 5150,-7085.2 5157.5,-7085.2 ; U21.13@5151.2,-7084 U21.13@5155,-7080.2 ; U21.13@5155,-7080.2 5160,-7080.2 ; 5157.5,-7085.2 5163.8,-7091.5 ; 5157.5,-7085.2 5160,-7085.2 ; 5160,-7085.2 5165,-7090.2 5163.8,-7091.5 ; 5160,-7085.2 5165,-7085.2 ; 5160,-7080.2 v1(5187.5,-7080.2) ; 5160,-7080.2 v1(5187.5,-7080.2) ; 5163.8,-7091.5 5177.5,-7105.2 5255,-7105.2 C71.1@5268.8,-7091.4 ; 5165,-7085.2 C71.1@5272.5,-7085.2 ; 5165,-7085.2 C71.1@5272.5,-7085.2 ; v1@5195,-7075.2 5262.5,-7075.2 C71.1@5267.5,-7080.2 ; C71.1@5267.5,-7080.2 C71.1@5272.5,-7085.2 ; C71.1@5267.5,-7080.2 C71.1@5272.5,-7085.2 ; C71.1@5268.8,-7091.4 5272.5,-7087.7 C71.1@5272.5,-7085.2
  Top Layer w10: C64.1@3502.5,-5197.5 3475,-5170 U20.1@3447.5,-5170 3435,-5182.5 R94.1@3435,-5235 R93.1@3435,-5315 3462.5,-5315 3492.5,-5345 3492.5,-5452.5 3467.5,-5477.5 3467.5,-5542.5 3487.5,-5562.5 3687.5,-5562.5 3725,-5525 v1(4142.5,-5525) ; 5160,-7080.2 5165,-7085.2 ; 5170,-7090.2 5177.5,-7097.7 5260,-7097.7 C71.1@5267.5,-7090.2 ; C71.1@5267.5,-7090.2 5272.5,-7085.2 C71.1@5267.5,-7090.2
  Top Layer w20: v1(5245,-7080.2) C71.1@5267.5,-7080.2 ; C71.1@5272.5,-7085.2 5282.5,-7095.2 5315,-7095.2 ; v1(5350,-7130.2) 5315,-7095.2 ; 5450,-7097.5 5450,-7112.7 5400,-7112.7 5400,-7095.2 ; 5520,-7097.5 5520,-7080.2 5450,-7080.2 ; C71.1@5267.5,-7080.2 v1(5300,-7080.2) ; C71.1@5267.5,-7080.2 v1(5300,-7080.2) ; v1(5300,-7080.2) v1(5400,-7080.2) 5450,-7080.2 ; 5315,-7095.2 5400,-7095.2 ; 5400,-7095.2 5450,-7095.2 5450,-7080.2
  Mid-Layer 2 w10: v1(4142.5,-5525) 4142.5,-6305 4190,-6352.5 5117.5,-6352.5 5215,-6450 5215,-6880 5212.5,-6882.5 5212.5,-7020 5205,-7027.5 5205,-7077.7 ; 5205,-7077.7 5207.5,-7080.2 5205,-7077.7
  Mid-Layer 2 w20: v1(5187.5,-7080.2) 5187.5,-7097.7 5317.5,-7097.7 v1(5350,-7130.2) ; v1(5245,-7080.2) v1(5217.5,-7080.2) ; v1(5300,-7080.2) v1(5400,-7080.2) 5400,-7097.6 5399.9,-7097.7 ; ~FV5.FV@5207.5,-7080.2 v1(5217.5,-7080.2) ; ~FV5.FV@5207.5,-7080.2 v1(5217.5,-7080.2) ; ~FV5.FV@5207.5,-7080.2 v1(5217.5,-7080.2)
  other v1: 5205,-6705 5205,-6655 5205,-6605 5205,-6555 5205,-6505
BEEP_1: R5.1 U1.43 | length 2038.1
  Top Layer w10: v1(4882.5,-3262.5) 4882.5,-3237.1 4932.1,-3187.5 U1.43@4932.1,-3099.6
  Top Layer w12: R5.1@4145,-4295 4145,-4317.5 4185,-4357.5 4455,-4357.5 4457.5,-4355 4457.5,-4015 4530,-3942.5 4530,-3305 v1(4517.5,-3292.5)
  Bottom Layer w10: v1(4517.5,-3292.5) 4695,-3292.5 4727.5,-3325 4820,-3325 v1(4882.5,-3262.5)
BL_EN_1: J1.20 U1.2 | length 2326.8
  Top Layer w10: U1.2@5335.6,-3621.3 5371.3,-3621.3 5440,-3690 v1(5505,-3690)
  Mid-Layer 2 w10: v1(4872.5,-4385) 5005,-4385 5500,-3890 5500,-3695 v1(5505,-3690)
  Bottom Layer w10: J1.20@3984.9,-4767 3984.9,-4730.1 4362.5,-4352.5 4505,-4352.5 4537.5,-4385 v1(4872.5,-4385)
BUZZ_1: R6.1 U1.38 | length 1724.2
  Top Layer w10: v1(4882.5,-3300) 4987.8,-3194.7 4987.8,-3180.3 5030.6,-3137.5 U1.38@5030.6,-3099.6
  Top Layer w12: R6.1@4422.5,-4320 4422.5,-4017.5 4505,-3935 4505,-3327.5 v1(4495,-3317.5)
  Bottom Layer w10: v1(4495,-3317.5) 4497.5,-3320 4680,-3320 4710,-3350 4832.5,-3350 v1(4882.5,-3300)
CLK_3: R119.1 U24.17 | length 736.3
  Top Layer w10: U24.17@1368.8,-2551 1396.5,-2551 1422.5,-2525 1852.5,-2525 v1(1860,-2532.5) ; v1(4530,-2622.5) R119.1@4565,-2622.5
  Mid-Layer 2 w10: 4355,-2652.5 4515,-2652.5 4530,-2637.5 v1(4530,-2622.5)
DATA_3: R120.1 U24.18 | length 746.8
  Top Layer w10: U24.18@1368.8,-2531.3 1383.7,-2531.3 1412.5,-2502.5 v1(1877.5,-2502.5) ; v1(4497.5,-2622.5) 4497.5,-2637.5 4542.5,-2682.5 R120.1@4565,-2682.5
  Mid-Layer 2 w10: 4372.5,-2622.5 v1(4497.5,-2622.5)
DB0_1: J1.16 U1.91 | length 1653.2
  Top Layer w10: v1(5060,-3657.5) 5079.4,-3657.5 5089.7,-3667.8 U1.91@5089.7,-3709.6
  Mid-Layer 2 w10: v1(4565,-4457.5) 4565,-4267.5 4995,-3837.5 4995,-3722.5 v1(5060,-3657.5)
  Bottom Layer w10: J1.16@4142.5,-4767 4142.5,-4730 4415,-4457.5 v1(4565,-4457.5)
DB1_1: J1.15 U1.94 | length 1764.9
  Top Layer w10: U1.94@5148.8,-3709.6 5148.8,-3671.2 5165,-3655 v1(5182.5,-3655)
  Mid-Layer 2 w10: v1(4592.5,-4505) 4610,-4505 4622.5,-4492.5 4622.5,-4270 5080,-3812.5 5150,-3812.5 5182.5,-3780 v1(5182.5,-3655)
  Bottom Layer w10: J1.15@4181.9,-4767 4181.9,-4730.6 4407.5,-4505 v1(4592.5,-4505)
DB2_1: J1.14 U1.98 | length 1740.1
  Top Layer w10: v1(5220,-3655) 5227.6,-3662.6 U1.98@5227.6,-3709.6
  Mid-Layer 2 w10: v1(4600,-4535) 4610,-4535 4645,-4500 4645,-4277.5 5087.5,-3835 5160,-3835 5220,-3775 v1(5220,-3655)
  Bottom Layer w10: J1.14@4221.3,-4767 4221.3,-4728.7 4415,-4535 v1(4600,-4535)
DB3_1: J1.13 U1.99 | length 1618.8
  Top Layer w10: U1.99@5247.3,-3709.6 5247.3,-3759.8 v1(5247.5,-3760)
  Mid-Layer 2 w10: v1(4592.5,-4567.5) 4607.5,-4567.5 4667.5,-4507.5 4667.5,-4285 5095,-3857.5 5170,-3857.5 5247.5,-3780 v1(5247.5,-3760) v1@5247.3,-3759.8
  Bottom Layer w10: J1.13@4260.7,-4767 4260.7,-4729.3 4422.5,-4567.5 v1(4592.5,-4567.5)
DB4_1: J1.12 U1.100 | length 1644.4
  Top Layer w10: U1.100@5267,-3709.6 5267,-3739.5 5280,-3752.5 v1(5280,-3760)
  Mid-Layer 2 w10: v1(4592.5,-4600) 4605,-4600 4690,-4515 4690,-4350 4817.5,-4222.5 4942.5,-4222.5 5042.5,-4122.5 5042.5,-4022.5 5280,-3785 v1(5280,-3760)
  Bottom Layer w10: J1.12@4300.1,-4767 4300.1,-4729.9 4430,-4600 v1(4592.5,-4600)
DB5_1: J1.11 U1.3 | length 1934.3
  Top Layer w10: U1.3@5335.6,-3601.6 5381.6,-3601.6 5427.5,-3647.5 v1(5437.5,-3647.5)
  Mid-Layer 2 w10: v1(4697.5,-4635) 4790,-4542.5 4790,-4370 4847.5,-4312.5 4980,-4312.5 5432.5,-3860 5432.5,-3652.5 v1(5437.5,-3647.5)
  Bottom Layer w10: J1.11@4339.5,-4767 4339.5,-4728 4440,-4627.5 4690,-4627.5 v1(4697.5,-4635)
DB6_1: J1.10 U1.4 | length 1907.6
  Top Layer w10: U1.4@5335.6,-3581.9 5391.9,-3581.9 5417.5,-3607.5 v1(5427.5,-3607.5)
  Mid-Layer 2 w10: v1(4670,-4657.5) 4670,-4625 4762.5,-4532.5 4762.5,-4367.5 4840,-4290 4972.5,-4290 5410,-3852.5 5410,-3625 v1(5427.5,-3607.5)
  Bottom Layer w10: J1.10@4378.9,-4767 4378.9,-4731.1 4460,-4650 4662.5,-4650 v1(4670,-4657.5)
DB7_1: J1.9 U1.5 | length 1881.1
  Top Layer w10: U1.5@5335.6,-3562.2 5412.2,-3562.2 v1(5420,-3570)
  Mid-Layer 2 w10: v1(4642.5,-4677.5) 4642.5,-4622.5 4735,-4530 4735,-4365 4832.5,-4267.5 4965,-4267.5 5090,-4142.5 5090,-4042.5 5387.5,-3745 5387.5,-3602.5 v1(5420,-3570)
  Bottom Layer w10: J1.9@4418.3,-4767 4418.3,-4724.2 4465,-4677.5 v1(4642.5,-4677.5)
DISP_ON_1: J1.4 U1.1 | length 1521.4
  Top Layer w10: U1.1@5335.6,-3641 5360,-3665.4 v1(5360,-3670)
  Mid-Layer 2 w10: v1@4615.3,-4707.8 v1(4615,-4707.5) 4615,-4620 4712.5,-4522.5 4712.5,-4357.5 4825,-4245 4955,-4245 5067.5,-4132.5 5067.5,-4035 5360,-3742.5 v1(5360,-3670)
  Bottom Layer w10: v1(4615,-4707.5) 4615.3,-4707.8 J1.4@4615.3,-4767
FIELDGND: C42.2 C43.2 C46.2 C48.2 C49.1 C50.2 C51.2 C52.2 C53.2 C54.2 C55.2 C56.2 C125.2 C128.2 C132.2 R53.2 R56.2 R58.1 R62.2 R129.2 U13.8 U14.2 U15.4 U16.2 U16.7 U16.9 U17.5 U35.2 ~FV9.FV ~FV10.FV ~FV11.FV ~FV12.FV ~FV13.FV ~FV14.FV ~FV15.FV ~FV16.FV ~FV17.FV ~FV18.FV ~FV19.FV ~FV20.FV ~FV21.FV ~FV22.FV | length 19225
  Top Layer w10: U13.8@6084.9,-3469.3 v1@6084.9,-3582.4 ; v1@6084.9,-3582.4 v1(6085,-3582.5) v1@6084.9,-3582.4
  Top Layer w12: U17.5@5716.8,-4927.5 5716.8,-4944.3 5725,-4952.5 v1(5765,-4952.5) ; U16.9@6040.2,-4562.4 6050,-4572.2 U16.9@6050,-4577.5 ; U16.9@6050,-4552.6 U16.9@6050,-4547.5 ; v1(6050,-4455) U16.2@6050,-4502.5 ; v1(6050,-4677.5) U16.7@6050,-4622.3 ; v1(6050,-4677.5) U16.7@6050,-4622.3 ; v1(6050,-4677.5) U16.7@6050,-4622.3 ; U16.7@6050,-4622.3 U16.9@6050,-4577.5 ; U16.7@6050,-4622.3 U16.9@6050,-4577.5 ; U16.9@6050,-4547.5 U16.2@6050,-4502.5 ; U16.9@6050,-4547.5 U16.2@6050,-4502.5
  Top Layer w20: v1(6050,-4677.5) 6075,-4702.5 6075,-4715 6075,-4750 C46.2@6110,-4785
  Top Layer w25: v1(5885,-5600) 5977.5,-5600 ; 5927.5,-5487.5 5977.5,-5487.5 ; 5927.5,-5460 5977.5,-5460 5977.5,-5487.5 ; C125.2@5930,-5710 5920,-5710 5920,-5687.5 5977.5,-5687.5 5977.5,-5600 ; 5947.5,-4050 5947.5,-4037.5 5947.5,-4025 U15.4@5950,-4022.5 ; R53.2@6175,-4172.5 6162.5,-4160 v1(6147.5,-4160) ; 5952.5,-5510 v1(5927.5,-5510) 5952.5,-5510 ; 5952.5,-5510 5977.5,-5535 ; 5977.5,-5600 5977.5,-5535 ; 5977.5,-5600 U35.2@6027.5,-5600 ; 5977.5,-5535 5977.5,-5487.5 ; U35.2@6027.5,-5600 v1(6067.5,-5600) ; U35.2@6027.5,-5600 v1(6067.5,-5600) ; v1(6067.5,-5600) 6115,-5600 ; 6115,-5600 6115,-5580 ; 6115,-5600 v1(6142.5,-5600) v1(6180,-5600) v1(6215,-5600) ; 6115,-5580 6115,-5560 v1(6312.5,-5560) ; 6115,-5580 C128.2@6312.5,-5580 ; 6115,-5530 6115,-5545 6312.5,-5545 ; 6115,-5530 6115,-5510 R129.2@6130,-5510 ; 6115,-5530 6312.5,-5530 ; R129.2@6130,-5510 v1(6215,-5510) R129.2@6130,-5510 ; R129.2@6130,-5510 6130,-5507.5 6130,-5492.5 ; 6130,-5492.5 6312.5,-5492.5 ; 6130,-5492.5 6115,-5492.5 v1(6115,-5460) ~FV14.FV@6142.5,-5460 ~FV15.FV@6215,-5460 v1(6312.5,-5460) ; v1(6147.5,-4160) U14.2@6112.5,-4160 v1(6147.5,-4160) ; v1(6215,-5600) C128.2@6312.5,-5600 ; v1(6215,-5600) C128.2@6312.5,-5600 ; C128.2@6312.5,-5600 6330,-5600 ; C128.2@6312.5,-5600 6312.5,-5590 C128.2@6312.5,-5580 ; C128.2@6312.5,-5580 v1(6312.5,-5560) ; C128.2@6312.5,-5580 v1(6312.5,-5560) ; v1(6312.5,-5560) 6312.5,-5545 ; 6312.5,-5545 6312.5,-5492.5 ; 6312.5,-5545 6312.5,-5530 ; 6312.5,-5530 6312.5,-5492.5 ; 6312.5,-5492.5 v1(6312.5,-5460) ; 6312.5,-5492.5 v1(6312.5,-5460) ; 6312.5,-5492.5 v1(6312.5,-5460) ; v1(6312.5,-5460) 6330,-5460 ; 6330,-5600 v1(6342.5,-5600) 6330,-5600 ; 6330,-5600 6330,-5460 ; 6330,-5460 v1(6342.5,-5460) 6330,-5460
  Top Layer w30: v1(5852.5,-4470) 5820,-4470 v1(5820,-4432.5) ; R56.2@5852.5,-4415 R56.2@5852.5,-4432.5 ; v1(5890,-4532.5) v1(5852.5,-4532.5) v1(5820,-4532.5) ; v1(5922.5,-3690) C48.2@5950,-3690 ; v1(5927.5,-4682.5) 5945,-4665 ; 5947.5,-4037.5 5935,-4037.5 ; v1(6060,-4547.5) U16.9@6055.1,-4547.5 ; v1(6115,-4645) 6115,-4622.5 ; v1(6152.5,-4532.5) 6152.5,-4557.5 ; v1(6227.5,-4645) v1(6190,-4645) 6152.5,-4645 ; C49.1@6232.5,-3677.5 C49.1@6225,-3685 ; v1(6260,-6000) v1@6262.5,-6000 ; v1(6265,-4682.5) v1(6152.5,-4682.5) ; v1(6302.5,-4645) 6302.5,-4557.5 6152.5,-4557.5 ; v1(6302.5,-4470) 6302.5,-4492.5 ; v1(6317.5,-3857.5) 6297.5,-3857.5 6287.5,-3847.5 C52.2@6287.5,-3832.5 ; 5820,-4610 v1(5820,-4582.5) ; 5820,-4610 5820,-4625 5952.5,-4625 v1@5965,-4612.5 ; 5820,-4610 5962.5,-4610 v1(5965,-4607.5) ; 5820,-4610 v1(5820,-4582.5) ; v1(5820,-4582.5) v1(5852.5,-4582.5) ; v1(5820,-4582.5) 5820,-4557.5 ; 5820,-4557.5 v1(5820,-4532.5) ; 5820,-4557.5 v1(5820,-4532.5) ; 5820,-4557.5 v1(5965,-4557.5) ; v1(5820,-4432.5) R56.2@5852.5,-4432.5 ; v1(5820,-4432.5) R56.2@5852.5,-4432.5 ; v1(5852.5,-4582.5) v1(5965,-4582.5) ; v1(5852.5,-4582.5) v1(5965,-4582.5) ; R56.2@5852.5,-4432.5 v1(5890,-4432.5) ; R56.2@5852.5,-4432.5 v1(5890,-4432.5) ; v1(5890,-4432.5) 5890,-4450 5947.5,-4507.5 ; 5897.5,-4037.5 5935,-4037.5 ; 5897.5,-4037.5 5897.5,-4105 5912.5,-4120 ; 5897.5,-4037.5 ~FV10.FV@5872.5,-4037.5 C43.2@5872.5,-4090 5902.5,-4120 5912.5,-4120 ; 5912.5,-4120 5925,-4120 ; 5925,-4120 5925,-4047.5 5935,-4037.5 ; 5925,-4120 5947.5,-4120 v1(5947.5,-4092.5) ; 5935,-4037.5 5947.5,-4050 ; 5945,-4665 5820,-4665 v1(5820,-4645) v1(5852.5,-4645) v1(5890,-4645) v1(5927.5,-4645) v1(5965,-4645) ; 5945,-4665 v1(5965,-4645) ; 5947.5,-4507.5 v1(5965,-4507.5) ; 5947.5,-4507.5 v1(5965,-4507.5) ; v1(5947.5,-4092.5) 5947.5,-4050 ; v1(5947.5,-4092.5) 5947.5,-4050 ; v1(5965,-4645) v1@5965,-4612.5 ; v1@5965,-4612.5 v1(5965,-4607.5) ; v1(5965,-4607.5) v1(5965,-4582.5) ; v1(5965,-4582.5) v1(5965,-4557.5) ; v1(5965,-4582.5) v1(5965,-4557.5) ; v1(5965,-4582.5) 5970,-4577.5 5997.5,-4577.5 ; v1(5965,-4507.5) 5965,-4520 v1(5990,-4545) 5990,-4570 5997.5,-4577.5 ; 5997.5,-4577.5 v1(6020,-4577.5) ; v1(6020,-4577.5) U16.9@6025.1,-4577.5 ; v1(6020,-4577.5) U16.9@6025.1,-4577.5 ; U16.9@6025.1,-4577.5 U16.9@6050,-4577.5 ; U16.9@6025.1,-4577.5 U16.9@6040.2,-4562.4 ; U16.9@6034.9,-4562.4 6034.9,-4562.6 6035.1,-4562.4 U16.9@6040.2,-4562.4 ; U16.9@6034.9,-4562.4 U16.9@6040.2,-4562.4 ; U16.9@6034.9,-4562.4 v1(6020,-4547.5) 6050,-4547.5 U16.9@6055.1,-4547.5 ; U16.9@6040.2,-4562.4 6050,-4552.6 U16.9@6055.1,-4547.5 ; U16.9@6040.2,-4562.4 U16.9@6072.6,-4562.4 ; U16.9@6050,-4577.5 v1(6060,-4577.5) ; U16.9@6050,-4577.5 v1(6060,-4577.5) ; v1(6060,-4577.5) 6082.5,-4577.5 ; U16.9@6072.6,-4562.4 v1(6090,-4545) ; U16.9@6072.6,-4562.4 v1(6090,-4545) ; 6082.5,-4577.5 v1(6090,-4570) ; 6082.5,-4577.5 6110,-4577.5 v1(6115,-4582.5) ; v1(6090,-4570) v1(6090,-4545) ; v1(6090,-4570) v1(6090,-4545) ; v1(6090,-4545) 6102.5,-4532.5 ; 6102.5,-4532.5 v1(6115,-4532.5) ; 6102.5,-4532.5 v1(6115,-4532.5) ; 6115,-4622.5 v1(6115,-4607.5) ; 6115,-4622.5 6130,-4622.5 6130,-4617.5 v1@6115,-4602.5 ; v1(6115,-4607.5) v1@6115,-4602.5 ; v1(6115,-4607.5) v1@6115,-4602.5 ; v1@6115,-4602.5 v1(6115,-4582.5) ; v1(6115,-4582.5) v1(6115,-4557.5) v1(6115,-4532.5) ; v1(6115,-4532.5) v1@6115,-4515 ; v1@6115,-4515 v1(6115,-4507.5) ; v1@6115,-4515 6143.7,-4515 ; v1(6115,-4507.5) 6115,-4492.5 ; v1(6115,-4507.5) 6130,-4492.5 ; v1(6115,-4507.5) 6115,-4492.5 ; 6115,-4492.5 6115,-4470 6143.7,-4441.3 ; 6115,-4492.5 6130,-4492.5 ; 6130,-4492.5 6143.7,-4492.5 ; 6143.7,-4557.5 6152.5,-4557.5 ; 6143.7,-4557.5 6143.7,-4673.7 v1(6152.5,-4682.5) ; 6143.7,-4557.5 6143.7,-4515 ; 6143.7,-4515 6152.5,-4515 ; 6143.7,-4515 6143.7,-4492.5 ; 6143.7,-4492.5 6143.7,-4441.3 ; 6143.7,-4441.3 v1(6152.5,-4432.5) 6143.7,-4441.3 ; v1(6152.5,-4682.5) 6152.5,-4645 ; 6152.5,-4645 v1(6152.5,-4582.5) 6152.5,-4557.5 ; 6152.5,-4515 6152.5,-4492.5 6302.5,-4492.5 ; 6152.5,-4515 6302.5,-4515 6302.5,-4492.5 ; C49.1@6225,-3685 v1(6225,-3730) C49.1@6225,-3685 ; v1@6262.5,-6000 6262.5,-5952.5 v1(6312.5,-5952.5) 6327.5,-5952.5 6327.5,-6000 C132.2@6312.5,-6000 v1@6262.5,-6000 ; C52.2@6287.5,-3832.5 6317.5,-3832.5 v1(6317.5,-3820) ~FV11.FV@6287.5,-3820 C52.2@6287.5,-3832.5 ; v1(5697.5,-5302.5) C55.2@5747.5,-5302.5 v1(5697.5,-5302.5) ; v1(5700,-4782.5) C56.2@5747.5,-4782.5 v1(5700,-4782.5) ; v1(5765,-4952.5) 5765,-4925 v1(5765,-4952.5) ; C50.2@6295,-3975 v1(6325,-3975) C50.2@6295,-3975
  Mid-Layer 1 w12: v1(5820,-4682.5) v1(5820,-4645) ; v1(5852.5,-4645) v1(5852.5,-4582.5) v1(5852.5,-4532.5) v1(5852.5,-4470) ; v1(5965,-4582.5) v1(5965,-4557.5) v1(5965,-4532.5) v1(5965,-4507.5) ; v1(5990,-4545) 5990,-4502.5 6020,-4532.5 v1(6020,-4547.5) v1(6020,-4577.5) v1(6060,-4577.5) v1(6060,-4547.5) 6060,-4507.5 6082.5,-4507.5 6090,-4515 v1(6090,-4545) v1(6090,-4570) 6102.5,-4582.5 v1(6115,-4582.5) ; v1(6067.5,-5600) v1(6142.5,-5600) ; v1(6115,-5460) ~FV14.FV@6142.5,-5460 ~FV15.FV@6215,-5460 v1(6312.5,-5460) v1(6342.5,-5460) v1(6342.5,-5600) v1(6215,-5600) ; v1(6115,-4507.5) v1(6115,-4532.5) v1(6115,-4557.5) v1(6115,-4582.5) ; v1(5820,-4645) v1(5820,-4582.5) ; v1(5820,-4645) v1(5820,-4582.5) ; v1(5820,-4582.5) v1(5820,-4532.5) ; v1(5820,-4582.5) v1(5820,-4532.5) ; v1(5820,-4532.5) v1(5820,-4432.5) v1(5820,-4532.5) ; v1(6115,-4582.5) v1(6115,-4607.5) v1(6115,-4582.5) ; v1(6142.5,-5600) v1(6180,-5600) v1(6215,-5600) ; v1(6142.5,-5600) v1(6215,-5600)
  Bottom Layer w10: C54.2@6057.5,-3602.5 6077.5,-3582.5 v1(6085,-3582.5)
  Bottom Layer w12: v1(6067.5,-5600) v1(6142.5,-5600) v1(6180,-5600) v1(6215,-5600) v1(6215,-5510) ~FV15.FV@6215,-5460 ~FV14.FV@6142.5,-5460 v1(6115,-5460)
  Bottom Layer w20: v1(5890,-4432.5) v1(6152.5,-4432.5)
  Bottom Layer w30: 5707.5,-5075 5662.5,-5075 R58.1@5662.5,-5017.5 ; v1(5735,-5065) R58.1@5697.5,-5065 ; 5820,-4760 5820,-4780 5920,-4780 6017.5,-4682.5 v1@6055,-4682.5 ; v1(5820,-4682.5) 5820,-4662.5 ; v1(5820,-4432.5) 5820,-4515 5822.5,-4512.5 6302.5,-4512.5 6302.5,-4557.5 v1(6115,-4557.5) v1(5965,-4557.5) 5820,-4557.5 ; v1(5852.5,-4582.5) v1(5820,-4582.5) ; v1(5890,-4432.5) 5910,-4452.5 6302.5,-4452.5 ; v1(5927.5,-4682.5) 5965,-4682.5 5970,-4677.5 ; v1(5965,-4582.5) v1(6115,-4582.5) v1(6152.5,-4582.5) ; v1(6115,-4607.5) v1(5965,-4607.5) 5822.5,-4607.5 5820,-4610 ; v1(6152.5,-4682.5) v1@6147.5,-4682.5 ; v1(6152.5,-4532.5) v1(6115,-4532.5) ; v1(6152.5,-4432.5) v1(6190,-4432.5) ; 6201.3,-4725 6201.3,-4736.3 ; C42.2@6210,-3680 6225,-3695 v1(6225,-3730) 6227.5,-3730 v1(6317.5,-3820) 6325,-3827.5 v1(6325,-3975) ; 6227.5,-4702.5 6325,-4702.5 ; v1(6227.5,-4645) v1(6190,-4645) v1(6115,-4645) ; 6302.5,-4495 v1(6302.5,-4470) 6302.5,-4452.5 ; v1(6312.5,-5560) v1(6312.5,-5460) v1(6342.5,-5460) ; 6325,-4742.5 6310,-4742.5 6305,-4747.5 6227.5,-4747.5 ; 6330,-5600 v1(6342.5,-5600) ; R58.1@5662.5,-5017.5 5807.5,-5017.5 ; R58.1@5662.5,-5017.5 R58.1@5675,-5042.5 ; R58.1@5675,-5042.5 R58.1@5697.5,-5065 ; R58.1@5675,-5042.5 R58.1@5682.5,-5042.5 ; R58.1@5682.5,-5042.5 5782.5,-5042.5 5807.5,-5017.5 ; R58.1@5682.5,-5042.5 5706.2,-5018.8 5712.5,-5025 ; R58.1@5697.5,-5065 5697.5,-5055 5815,-5055 5815,-5025 5807.5,-5017.5 ; 5712.5,-5025 v1(5735,-5025) 5712.5,-5025 ; 5820,-4662.5 5822.5,-4665 5945,-4665 ; 5820,-4662.5 v1(5820,-4645) ; v1(5820,-4645) v1(5852.5,-4645) ; v1(5820,-4645) v1(5852.5,-4645) ; v1(5820,-4645) 5820,-4627.5 ; 5820,-4627.5 6302.5,-4627.5 v1(6302.5,-4645) 6302.5,-4665 ; 5820,-4627.5 5820,-4610 ; 5820,-4610 v1(5820,-4582.5) ; 5820,-4610 v1(5820,-4582.5) ; v1(5820,-4582.5) 5820,-4557.5 ; 5820,-4557.5 v1(5820,-4532.5) ; 5820,-4557.5 v1(5820,-4532.5) ; v1(5820,-4532.5) v1(5852.5,-4532.5) ; v1(5820,-4532.5) v1(5852.5,-4532.5) ; v1(5852.5,-4645) v1(5890,-4645) v1(5927.5,-4645) v1(5965,-4645) ; v1(5852.5,-4532.5) v1(5890,-4532.5) v1(5965,-4532.5) ; 5945,-4665 v1(5965,-4645) ; 5945,-4665 5970,-4665 ; v1(5965,-4645) v1(6115,-4645) ; v1(5965,-4532.5) v1(6115,-4532.5) ; v1(5965,-4532.5) v1(6115,-4532.5) ; 5970,-4677.5 v1(6050,-4677.5) ; 5970,-4677.5 5970,-4665 ; 5970,-4677.5 v1(6050,-4677.5) ; 5970,-4665 6135,-4665 ; v1(6050,-4677.5) v1@6055,-4682.5 ; v1(6050,-4677.5) v1@6055,-4682.5 ; v1@6055,-4682.5 v1@6147.5,-4682.5 ; v1(6115,-4645) 6135,-4665 ; 6135,-4665 6302.5,-4665 ; v1@6147.5,-4682.5 6190,-4725 ; 6190,-4725 6190,-4682.5 v1(6265,-4682.5) 6302.5,-4682.5 ; 6190,-4725 6201.3,-4736.3 ; 6201.3,-4736.3 6227.5,-4762.5 6227.5,-4747.5 ; 6227.5,-4747.5 6227.5,-4725 6307.5,-4725 6312.5,-4730 6325,-4730 6325,-4702.5 ; 6302.5,-4682.5 6302.5,-4665 ; 6302.5,-4682.5 6325,-4682.5 ; 6302.5,-4452.5 6302.5,-4432.5 6325,-4432.5 6325,-4682.5 ; 6325,-4702.5 6325,-4682.5 ; 6357.5,-6000 6357.5,-5952.5 ; 6357.5,-6000 v1(6260,-6000) 6260,-5952.5 v1(6312.5,-5952.5) 6357.5,-5952.5 ; 6357.5,-6000 6357.5,-5952.5